# Altium PCB main.PcbDoc
Units mm, origin at the board's own origin, x right, y up, seen from the top; angles counter-clockwise.
Board outline 99 x 99 mm, 4 copper layers (Top Layer, Layer 1, Layer 2, Bottom Layer), stack 1.591 mm thick; 78 components, 40 nets, 358 pads, 49 vias.
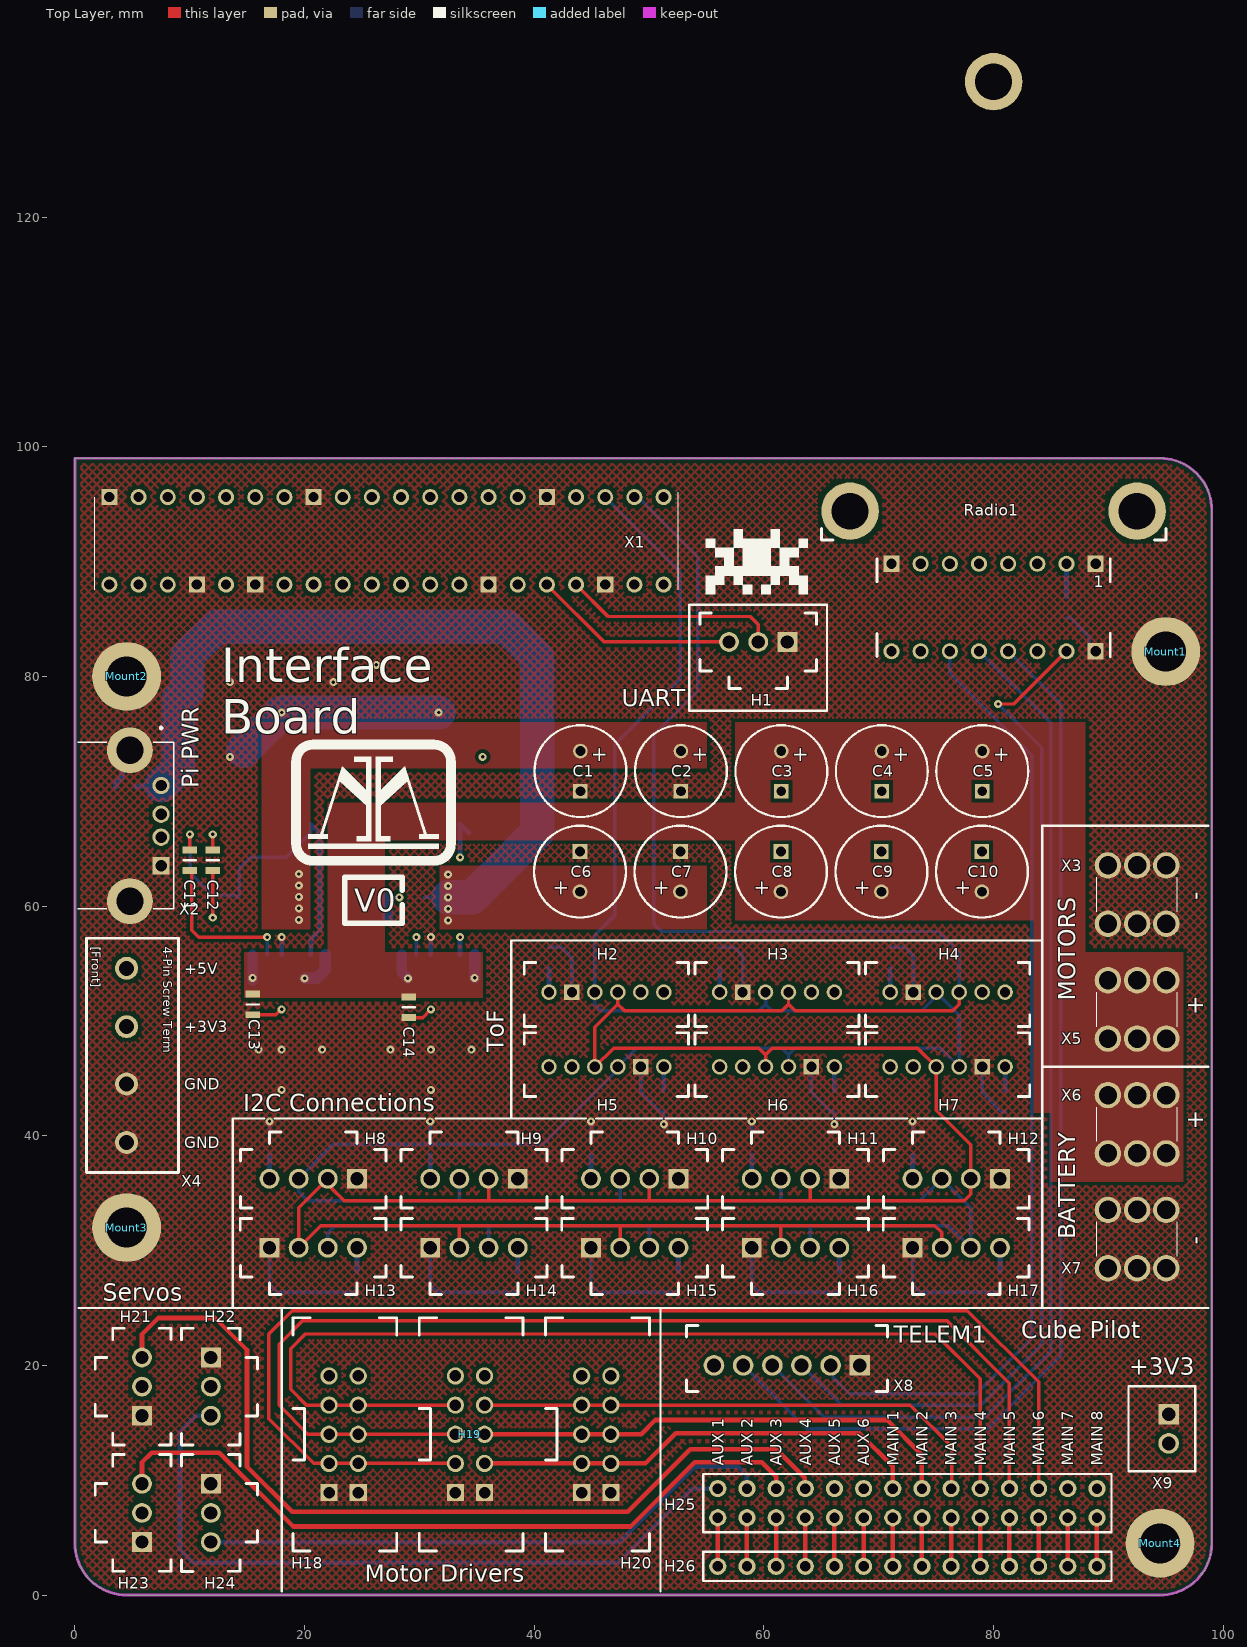
[diagram p0: Top Layer view]
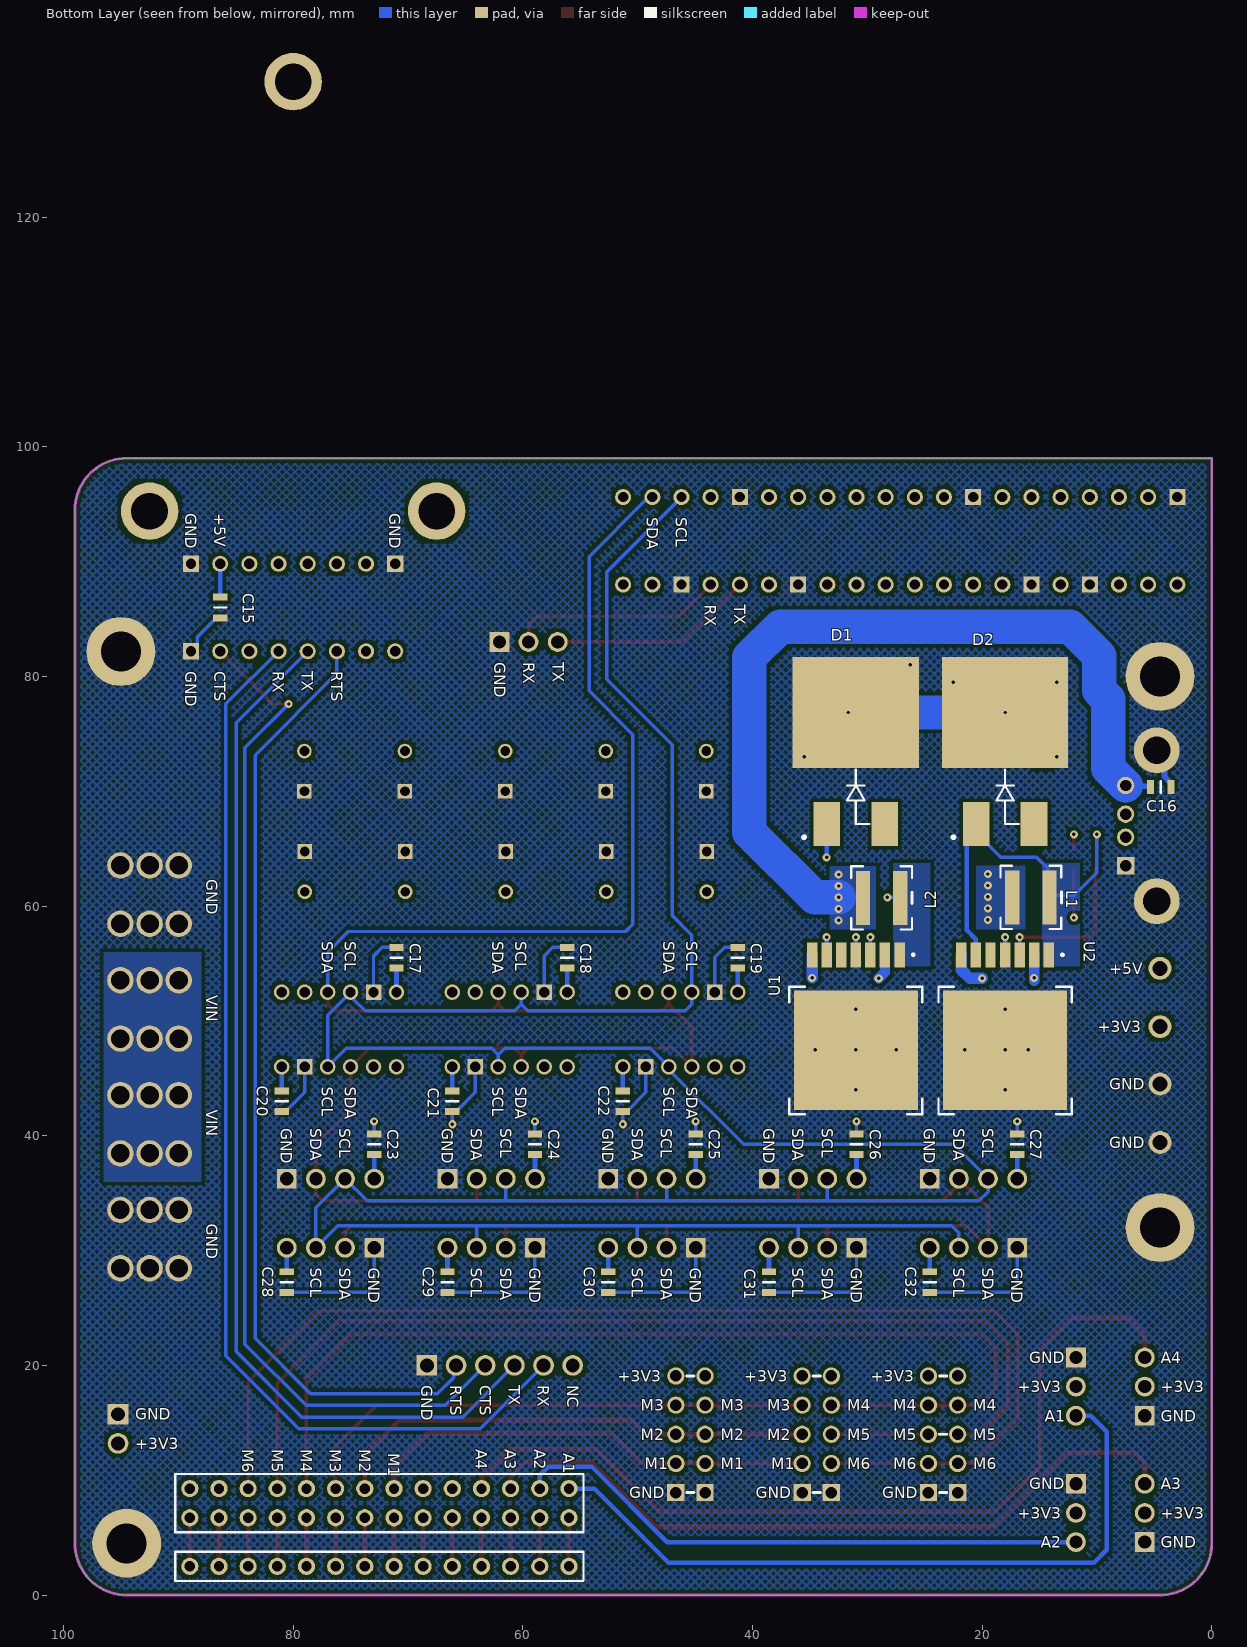
[diagram p1: Bottom Layer view, seen from below]
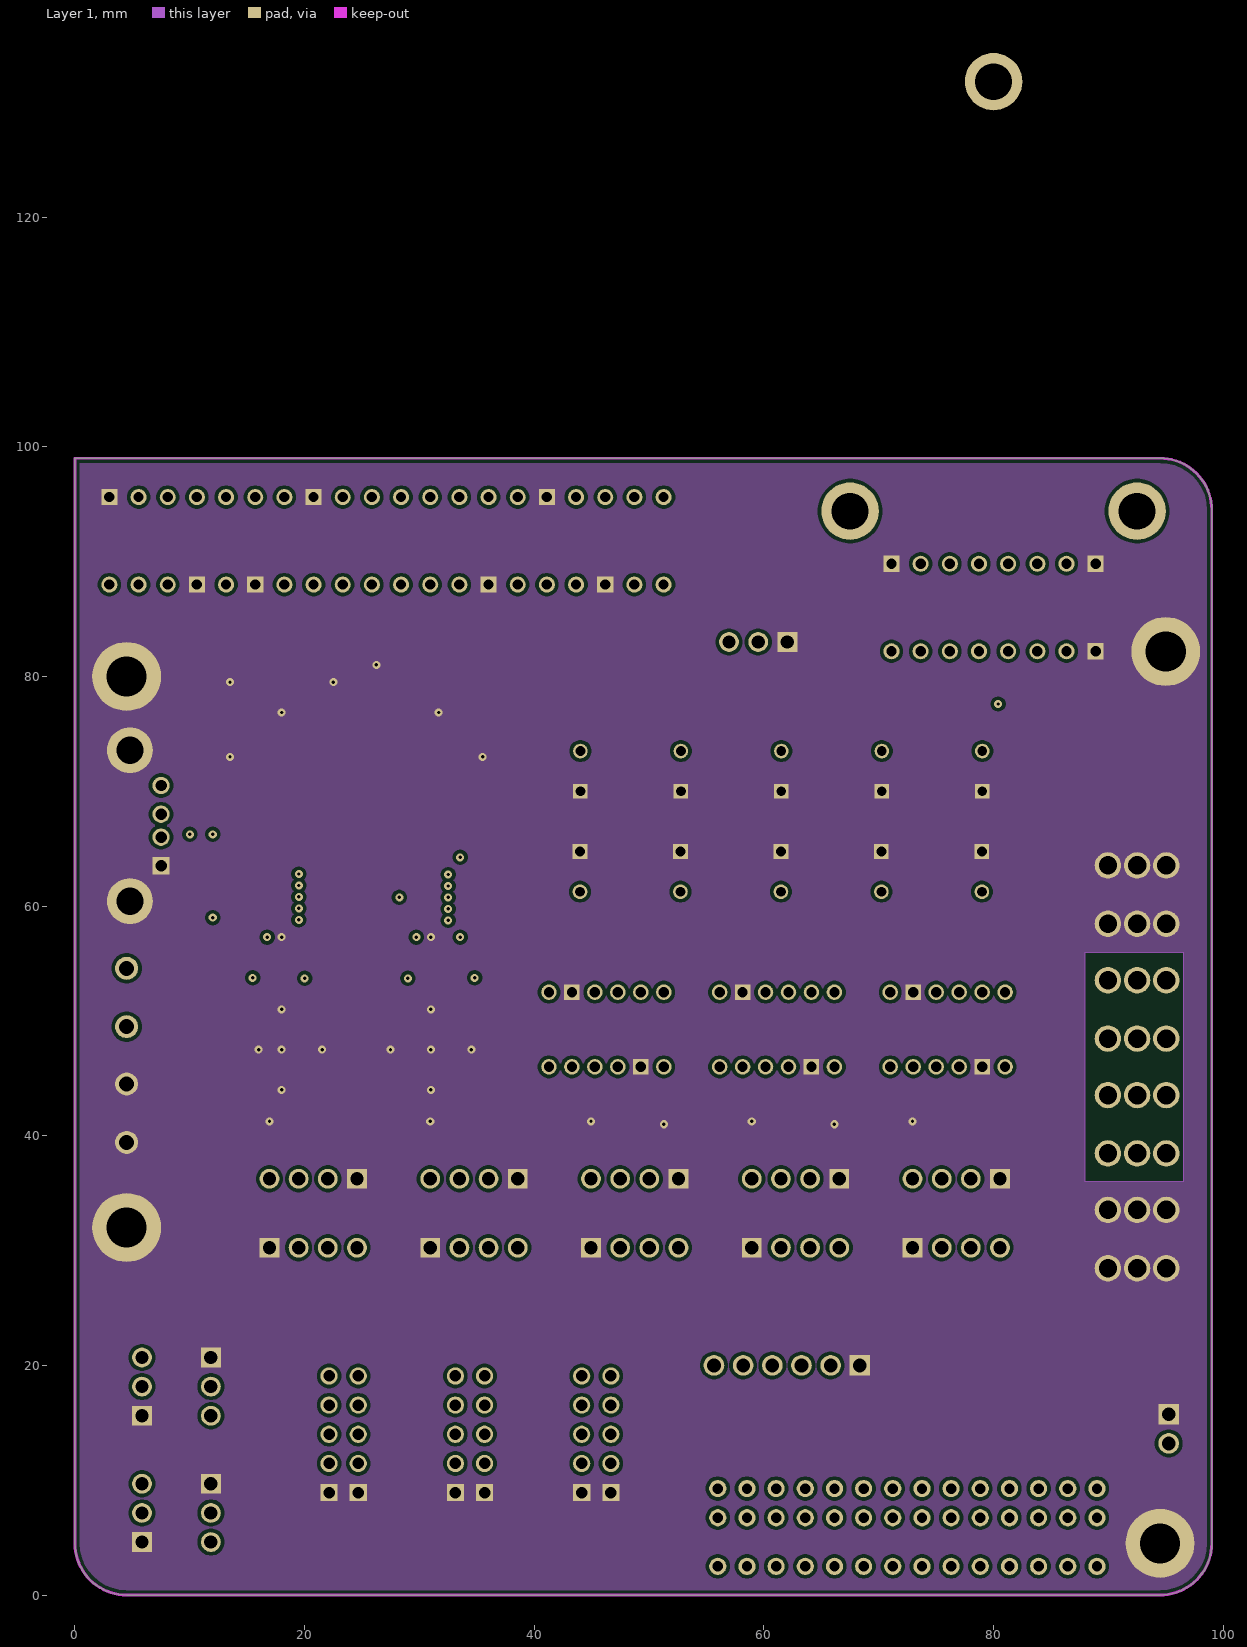
[diagram p2: Layer 1]
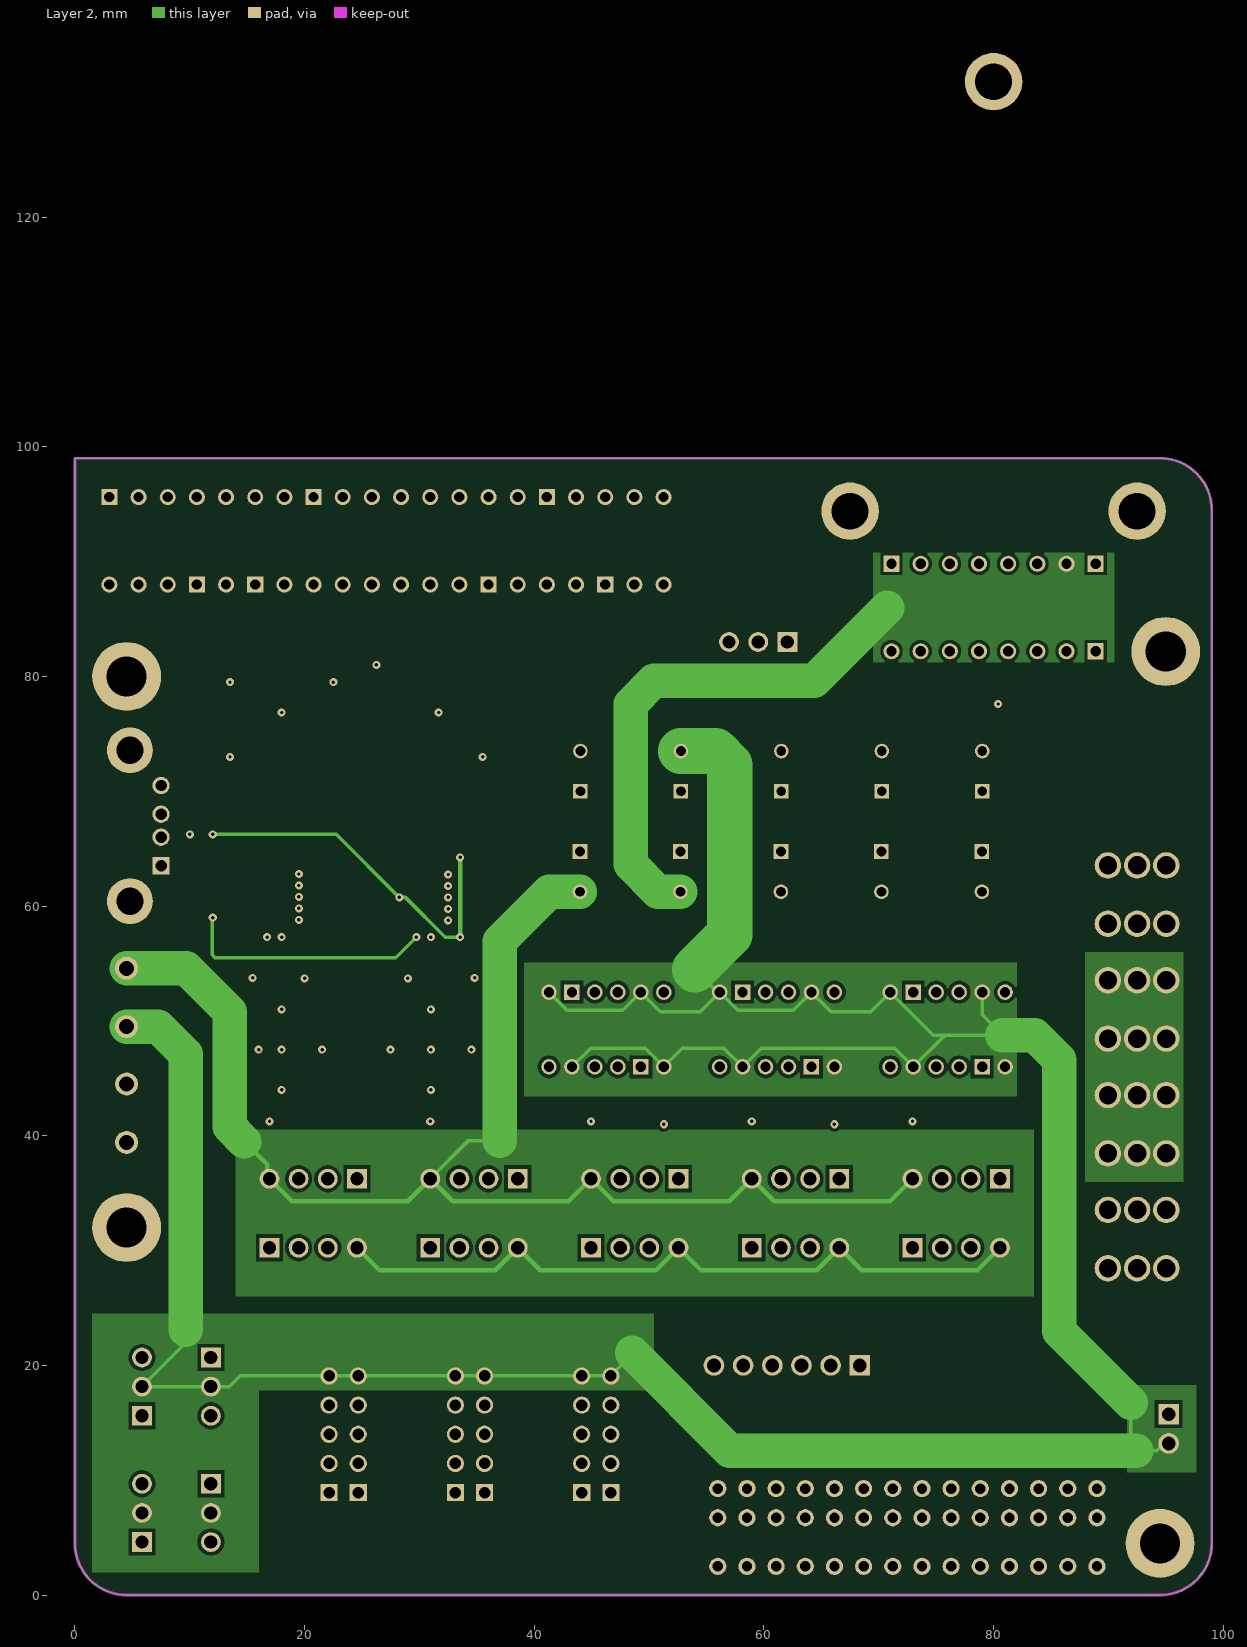
[diagram p3: Layer 2]

## Layer stack, top to bottom
Top Solder: solder mask 0.0102, Solder Resist, Dk 3.8
Top Layer: signal copper 0.035
Dielectric 2: prepreg 0.2104, 7628*1, Dk 4.4
Layer 1: signal copper 0.0175
Dielectric 1: dielectric 1.065, FR-4, Dk 4.8
Layer 2: signal copper 0.0175
Dielectric 3: prepreg 0.2104, 7628*1, Dk 4.4
Bottom Layer: signal copper 0.035
Bottom Solder: solder mask 0.0102, Solder Resist, Dk 3.8

## Board outline
4.5,0 cw(c4.5,4.5) 0,4.5 0,99 94.5,99 cw(c94.5,94.5) 99,94.5 99,4.5 cw(c94.5,4.5) 94.5,0

## Design rules (kind name [scope] priority, off if disabled: settings)
BoardOutlineClearance [All] p1: gap=0.2 ignorepadtopadclearanceinfootprint=FALSE
Clearance "inPolygon Clearance" [InPolygon] p1: gap=0.3 ignorepadtopadclearanceinfootprint=TRUE // this rule ensures that every net within a polygon of a different net has a set clearance from the poly
Clearance "Different Diff Pair" [All] p2: gap=0.2 ignorepadtopadclearanceinfootprint=TRUE
Clearance "Same Diff Pair" [All] p3: gap=0.1 ignorepadtopadclearanceinfootprint=TRUE
Clearance "Different Nets" [not InAnyDifferentialPair] p4: gap=0.3 ignorepadtopadclearanceinfootprint=TRUE except(0.1: Arc-SMDPad Arc-THPad Arc-Via Arc-Text Track-SMDPad Track-THPad Track-Via Track-Text SMDPad-Text THPad-Text Via-Text Fill-Text Poly-Text Region-Text Text-Text; 0.12: Arc-Arc Arc-Track Track-Track; 0.15: SMDPad-SMDPad SMDPad-THPad SMDPad-Via THPad-THPad THPad-Via Via-Via; 0.2: Arc-Hole Track-Hole SMDPad-Hole THPad-Hole Via-Hole Fill-Hole Poly-Hole Region-Hole Text-Hole)
Clearance "Same Net" [not InAnyDifferentialPair] p5: gap=0 ignorepadtopadclearanceinfootprint=TRUE except(0.1: THPad-Via; 0.18: Arc-Arc Arc-Track Track-Track)
ComponentClearance [All] p1: gap=0.102 collisioncheckmode=3 verticalgap=0.102 showdistances=TRUE
DiffPairsRouting "Ethernet Routing" [InDifferentialPairClass('Ethernet_Pairs')] p1: maxlimit=0.25 minlimit=0.2 mostfreqgap=0.25 toplayer_maxgap=0.2 toplayer_prefgap=0.2 toplayer_minwidth=0.25 toplayer_maxwidth=0.25 toplayer_prefwidth=0.25 midlayer1_mingap=0.25 midlayer1_minwidth=0.19 midlayer1_maxwidth=0.19 midlayer1_prefwidth=0.19 midlayer2_mingap=0.25 midlayer2_minwidth=0.19 midlayer2_maxwidth=0.19 midlayer2_prefwidth=0.19 bottomlayer_maxgap=0.2 bottomlayer_prefgap=0.2 bottomlayer_minwidth=0.25 bottomlayer_maxwidth=0.25 bottomlayer_prefwidth=0.25 impedanceprofiledriven=TRUE maxuncoupledlength=12.7
DiffPairsRouting "USB Routing" [InDifferentialPairClass('USB_Pairs')] p2: maxlimit=0.291 minlimit=0.127 mostfreqgap=0.291 toplayer_maxgap=0.127 toplayer_prefgap=0.127 toplayer_minwidth=0.23 toplayer_maxwidth=0.23 toplayer_prefwidth=0.23 midlayer1_mingap=0.291 midlayer1_minwidth=0.25 midlayer1_maxwidth=0.25 midlayer1_prefwidth=0.25 midlayer2_mingap=0.291 midlayer2_minwidth=0.25 midlayer2_maxwidth=0.25 midlayer2_prefwidth=0.25 bottomlayer_maxgap=0.127 bottomlayer_prefgap=0.127 bottomlayer_minwidth=0.23 bottomlayer_maxwidth=0.23 bottomlayer_prefwidth=0.23 impedanceprofiledriven=TRUE maxuncoupledlength=12.7
DiffPairsRouting "CAN Routing" [InDifferentialPairClass('CAN_Pairs')] p3: maxlimit=0.907 minlimit=0.5 mostfreqgap=0.907 toplayer_maxgap=0.5 toplayer_prefgap=0.5 toplayer_minwidth=0.201 toplayer_maxwidth=0.201 toplayer_prefwidth=0.201 midlayer1_mingap=0.907 midlayer1_minwidth=0.155 midlayer1_maxwidth=0.155 midlayer1_prefwidth=0.155 midlayer2_mingap=0.907 midlayer2_minwidth=0.155 midlayer2_maxwidth=0.155 midlayer2_prefwidth=0.155 bottomlayer_maxgap=0.5 bottomlayer_prefgap=0.5 bottomlayer_minwidth=0.201 bottomlayer_maxwidth=0.201 bottomlayer_prefwidth=0.201 impedanceprofiledriven=TRUE maxuncoupledlength=12.7
Height [All] p1: minheight=0 maxheight=1816.048 prefheight=12.7
HoleSize [All] p1: absolutevalues=TRUE maxlimit=6.3 minlimit=0.3 maxpercent=80.000 minpercent=20.000
HoleToHoleClearance [All] p1: gap=0.25 allowstackedmicrovias=FALSE
Length [All] p1: maxlimit=43.432 minlimit=0 usedelayunits=TRUE mindelay=0.000000 maxdelay=10000.000000
MatchedLengths "Diff Pair Matched Delays" [InDifferentialPairClass('Ethernet_Pairs') or InDifferentialPairClass('USB_Pairs') or InDifferentialPairClass('CAN_Pairs')] p1: tolerance=5 checknetsindiffpair=TRUE checkdiffpairvsdiffpair=FALSE checkxsignals=FALSE checkothers=FALSE usedelayunits=TRUE delaytolerance=100.000000
MinimumAnnularRing [All] p1: minimumring=0.2
MinimumSolderMaskSliver [All] p1: minsoldermaskwidth=0
PlaneClearance "Supply Net Clearance" [InNetClass('Supply_Nets')] p1: clearance=0.5
PlaneClearance "All Nets" [All] p2: clearance=0.3
PolygonConnect "Supply Nets" [InNetClass('Supply_Nets')] p1: connectstyle=Direct reliefconductorwidth=0.3 reliefentries=4 polygonreliefangle="90 Angle" airgapwidth=0.254
PolygonConnect General [All] p2: connectstyle=Relief reliefconductorwidth=0.254 reliefentries=4 polygonreliefangle="90 Angle" airgapwidth=0.254
RoutingVias [All] p1: holewidth=0.2 width=0.35 viastyle="Through Hole" minholewidth=0.15 minwidth=0.3 maxholewidth=6.3 maxwidth=6.55
SilkToSilkClearance [All] p1: silktosilkclearance=0
SilkToSolderMaskClearance [All] p1: minsilkscreentomaskgap=0 clearancetoexposedcopper=TRUE
SolderMaskExpansion [All] p1: expansion=0.075 istentingtop=FALSE
SupplyNets "Schematic Supply Nets_4" [InNet('+5V')] p1: voltage=0.000
SupplyNets "Schematic Supply Nets_2" [InNet('Battery VIN')] p2: voltage=0.000
SupplyNets "Schematic Supply Nets_7" [InNet('+3V3')] p3: voltage=0.000
SupplyNets "Schematic Supply Nets_3" [InNet('GND')] p4: voltage=0.000
UnRoutedNet [All] p1: checkbadconnections=TRUE
Width [All] p1: maxlimit=100 minlimit=0.1 preferedwidth=0.3
Width "nRF Width" [InNetClass('nRF Signal')] p2: maxlimit=0.379 minlimit=0.263 preferedwidth=0.379 toplayer_minwidth=0.379 midlayer1_maxwidth=0.263 midlayer1_prefwidth=0.263 midlayer2_maxwidth=0.263 midlayer2_prefwidth=0.263 bottomlayer_minwidth=0.379 impedanceprofiledriven=TRUE minimp=50.000000 maximp=50.000000 favimp=50.000000 checkconnectedcopper=TRUE
20 further rules are at their usual default settings.

## Classes and differential pairs
net class Supply_Nets: +3V3 +5V "Battery VIN" GND NetC6_2 NetC32_2
component class "Raspberry Pi and RF Devices": C15 C25 Radio1 X1
component class Misc: H1 Mount1 Mount3 Mount4
component class "Peripheral Connections": C11 C15 C21 C22 C23 C24 C25 C26 C27 C29 C31 H1 H3 H10 H13 H15 H16 H17 H20 H21 H22 H23 H25
net class "Motor VOUT": "Battery VIN"
component class Power: C3 C8 C9 C11 C13 C15 C23 C24 C25 D1 D2 L1 U1 U2 X3 X6 X9
component class "CubePilot and Motor Drivers": H1 H3 H20 H21 H22 H23 H25 H26 X8 X9

## Components (designator, comment, footprint, x,y, rotation, side; value= is the part's Value field where it differs from the comment)
C1 "Thru-Hole Polarized" "[Cap] Thru-Hole Polarized 3.5mm" 44,71.75 r270 top (schematic designator C31)
C2 "Thru-Hole Polarized" "[Cap] Thru-Hole Polarized 3.5mm" 52.75,71.75 r270 top (schematic designator C30)
C3 "Thru-Hole Polarized" "[Cap] Thru-Hole Polarized 3.5mm" 61.5,71.75 r270 top (schematic designator C9)
C4 "Thru-Hole Polarized" "[Cap] Thru-Hole Polarized 3.5mm" 70.25,71.75 r270 top (schematic designator C10)
C5 "Thru-Hole Polarized" "[Cap] Thru-Hole Polarized 3.5mm" 79,71.75 r270 top (schematic designator C8)
C6 "Thru-Hole Polarized" "[Cap] Thru-Hole Polarized 3.5mm" 44,63 r90 top (schematic designator C23)
C7 "Thru-Hole Polarized" "[Cap] Thru-Hole Polarized 3.5mm" 52.75,63 r90 top (schematic designator C22)
C8 "Thru-Hole Polarized" "[Cap] Thru-Hole Polarized 3.5mm" 61.5,63 r90 top (schematic designator C3)
C9 "Thru-Hole Polarized" "[Cap] Thru-Hole Polarized 3.5mm" 70.25,63 r90 top (schematic designator C4)
C10 "Thru-Hole Polarized" "[Cap] Thru-Hole Polarized 3.5mm" 79,63 r90 top (schematic designator C5)
C11 "SMD Nonpolarized" "[Cap] SMD 0805" 10,64 r90 top (schematic designator C32)
C12 "SMD Nonpolarized" "[Cap] SMD 0805" 12,64 r90 top (schematic designator C6)
C13 "SMD Nonpolarized" "[Cap] SMD 0805" 15.494,51.435 r90 top (schematic designator C7)
C14 "SMD Nonpolarized" "[Cap] SMD 0805" 29.083,51.181 r90 top (schematic designator C21)
C15 "SMD Nonpolarized" "[Cap] SMD 0805" 86.35,86 r270 bottom (schematic designator C2)
C16 "SMD Nonpolarized" "[Cap] SMD 0805" 4.445,70.375 r180 bottom (schematic designator C1)
C17 "SMD Nonpolarized" "[Cap] SMD 0805" 70.993,55.5 r270 bottom (schematic designator C29)
C18 "SMD Nonpolarized" "[Cap] SMD 0805" 56.14,55.5 r270 bottom (schematic designator C27)
C19 "SMD Nonpolarized" "[Cap] SMD 0805" 41.28,55.5 r270 bottom (schematic designator C25)
C20 "SMD Nonpolarized" "[Cap] SMD 0805" 81,43 r90 bottom (schematic designator C28)
C21 "SMD Nonpolarized" "[Cap] SMD 0805" 66.14,43 r90 bottom (schematic designator C26)
C22 "SMD Nonpolarized" "[Cap] SMD 0805" 51.28,43 r90 bottom (schematic designator C24)
C23 "SMD Nonpolarized" "[Cap] SMD 0805" 72.94,39.25 r270 bottom (schematic designator C12)
C24 "SMD Nonpolarized" "[Cap] SMD 0805" 58.94,39.25 r270 bottom (schematic designator C14)
C25 "SMD Nonpolarized" "[Cap] SMD 0805" 44.94,39.25 r270 bottom (schematic designator C16)
C26 "SMD Nonpolarized" "[Cap] SMD 0805" 30.94,39.25 r270 bottom (schematic designator C18)
C27 "SMD Nonpolarized" "[Cap] SMD 0805" 16.94,39.25 r270 bottom (schematic designator C20)
C28 "SMD Nonpolarized" "[Cap] SMD 0805" 80.56,27.25 r90 bottom (schematic designator C11)
C29 "SMD Nonpolarized" "[Cap] SMD 0805" 66.56,27.25 r90 bottom (schematic designator C13)
C30 "SMD Nonpolarized" "[Cap] SMD 0805" 52.56,27.25 r90 bottom (schematic designator C15)
C31 "SMD Nonpolarized" "[Cap] SMD 0805" 38.56,27.25 r90 bottom (schematic designator C17)
C32 "SMD Nonpolarized" "[Cap] SMD 0805" 24.56,27.25 r90 bottom (schematic designator C19)
D1 "Schottky" "[Diode] SMD TO263AB" 31,72 r180 bottom
D2 "Schottky" "[Diode] SMD TO263AB" 18,72 r180 bottom
H1 "1x3 Male" "[Header] Shrouded 1x3 Male" 59.5,83 r180 top (schematic designator H18)
H2 "35362-0650" "[Sherlock] 6pin" 46.28,52.5 r0 top (schematic designator H22)
H3 "35362-0650" "[Sherlock] 6pin" 61.14,52.5 r0 top (schematic designator H24)
H4 "35362-0650" "[Sherlock] 6pin" 76,52.5 r0 top (schematic designator H26)
H5 "35362-0650" "[Sherlock] 6pin" 46.28,46 r180 top (schematic designator H21)
H6 "35362-0650" "[Sherlock] 6pin" 61.14,46 r180 top (schematic designator H23)
H7 "35362-0650" "[Sherlock] 6pin" 76,46 r180 top (schematic designator H25)
H8 "1x4 Male" "[Header] Shrouded 1x4 Male" 20.75,36.25 r0 top (schematic designator H20)
H9 "1x4 Male" "[Header] Shrouded 1x4 Male" 34.75,36.25 r0 top (schematic designator H16)
H10 "1x4 Male" "[Header] Shrouded 1x4 Male" 48.75,36.25 r0 top (schematic designator H14)
H11 "1x4 Male" "[Header] Shrouded 1x4 Male" 62.75,36.25 r0 top (schematic designator H12)
H12 "1x4 Male" "[Header] Shrouded 1x4 Male" 76.75,36.25 r0 top (schematic designator H10)
H13 "1x4 Male" "[Header] Shrouded 1x4 Male" 20.75,30.25 r180 top (schematic designator H17)
H14 "1x4 Male" "[Header] Shrouded 1x4 Male" 34.75,30.25 r180 top (schematic designator H15)
H15 "1x4 Male" "[Header] Shrouded 1x4 Male" 48.75,30.25 r180 top (schematic designator H13)
H16 "1x4 Male" "[Header] Shrouded 1x4 Male" 62.75,30.25 r180 top (schematic designator H11)
H17 "1x4 Male" "[Header] Shrouded 1x4 Male" 76.75,30.25 r180 top (schematic designator H9)
H18 "2x5 Shrouded" "[Header] Shrouded 2x5 Male" 23.5,14 r270 top (schematic designator H6)
H19 "2x5 Shrouded" "[Header] Shrouded 2x5 Male" 34.5,14 r270 top (schematic designator H7)
H20 "2x5 Shrouded" "[Header] Shrouded 2x5 Male" 45.5,14 r270 top (schematic designator H8)
H21 "1x3 Male" "[Header] Shrouded 1x3 Male" 5.834,18.151 r90 top (schematic designator H5)
H22 "1x3 Male" "[Header] Shrouded 1x3 Male" 11.834,18.151 r270 top (schematic designator H2)
H23 "1x3 Male" "[Header] Shrouded 1x3 Male" 5.834,7.151 r90 top (schematic designator H4)
H24 "1x3 Male" "[Header] Shrouded 1x3 Male" 11.834,7.151 r270 top (schematic designator H3)
H25 "2x14 Header" "[Header] 2x14 Male" 72.49,8 r180 top (schematic designator H19)
H26 "1x14 Female Right Angle" "[Header] 1x14 Right Angle Female" 89,2.5 r180 top (schematic designator H1)
L1 "SMD Inductor" "[Inductor] 5.7 x 5.5 x 5 mm" 15.75,60.75 r90 bottom (schematic designator L2)
L2 "SMD Inductor" "[Inductor] 5.7 x 5.5 x 5 mm" 28.75,60.706 r90 bottom (schematic designator L1)
Mount1 "M3 Mount Hole" "[Mount] M3 Mount Hole"#1 91.841,83.305 r90 top (schematic designator Mount2)
Mount2 "M3 Mount Hole" "[Mount] M3 Mount Hole"#2 11.425,58.112 r0 top (schematic designator Mount1)
Mount3 "M3 Mount Hole" "[Mount] M3 Mount Hole"#3 6.223,31.496 r90 top
Mount4 "M3 Mount Hole" "[Mount] M3 Mount Hole"#4 94.5,4.5 r90 top
Radio1 "RFDX900" "[Device] RFDX900 Radio" 80,86 r0 top
U1 "5V 5A" "[Reg] 5V Regulator (3)" 31,49.5 r90 bottom
U2 "LM2678SX-3.3" "[Reg] 3V3 Regulator (3)" 18,49.5 r90 bottom
X1 "Raspberry Pi 5" "[Device] Raspberry Pi 5" 3,88 r0 top
X2 "Type A" "[Port] USB Type-A Female" 7.5,67 r270 top (schematic designator X8)
X3 "7461057" "[Port] Shank Connector (100A)" 92.5,61 r90 top (schematic designator X4)
X4 "4pin Screw Terminal" "[Screw Terminal] 4pin 5mm" 4.5,47 r270 top (schematic designator X9)
X5 "7461057" "[Port] Shank Connector (100A)" 92.5,51 r90 top (schematic designator X3)
X6 "7461057" "[Port] Shank Connector (100A)" 92.5,41 r90 top (schematic designator X2)
X7 "7461057" "[Port] Shank Connector (100A)" 92.5,31 r90 top (schematic designator X5)
X8 "JST" "[JST] 6pin 2.54mm" 62,20 r0 top (schematic designator X6)
X9 "JST" "[JST] 2PIN 2.54mm" 95.25,14.478 r90 top (schematic designator X7)

## Footprints (in the part's own frame and the unit in brackets; to place one, negate y for a bottom-side part, rotate by r counter-clockwise, add the part's x,y. Pads: shape width x height; smd on the part's side, far side on the other; paste and mask are expansions set on the pad)
"[Cap] SMD 0805" [mm]
  rect 0.6x1.25 smd: 1(-0.9,0) 2(0.9,0)
  silkscreen extent 0,-0.53 0,0.53, body extent -1,-0.63 1,0.63, height 1
"[Cap] Thru-Hole Polarized 3.5mm" [mm] "3.5mm"
  round 1.275 hole 0.85: 1(-1.75,0.018)
  rect 1.275x1.275 hole 0.85: 2(1.75,0.018)
  silkscreen extent -4,-3.98 4,4.02, body extent -4.24,-4.25 4.24,4.25, height 13
"[Device] Raspberry Pi 5" [mm]
  round 1.4 hole 0.9: 1(48.26,7.62) 2(48.26,0) 3(45.72,7.62) 4(45.72,0) 5(43.18,7.62) 7(40.64,7.62) 8(40.64,0) 10(38.1,0) 11(35.56,7.62) 12(35.56,0) 13(33.02,7.62) 15(30.48,7.62) 16(30.48,0) 17(27.94,7.62) 18(27.94,0) 19(25.4,7.62) 20(25.4,0) 21(22.86,7.62) 22(22.86,0) 23(20.32,7.62) 24(20.32,0) 26(17.78,0) 27(15.24,7.62) 28(15.24,0) 29(12.7,7.62) 31(10.16,7.62) 32(10.16,0) 33(7.62,7.62) 35(5.08,7.62) 36(5.08,0) 37(2.54,7.62) 38(2.54,0) 40(0,0)
  rect 1.4x1.4 hole 0.9: GND(0,7.62) GND(7.62,0) GND(12.7,0) GND(17.78,7.62) GND(33.02,0) GND(38.1,7.62) GND(43.18,0)
  silkscreen extent -1.27,-0.44 49.53,8.06, body extent -32.39,-7.99 56.65,12.65, height 56.94
"[Device] RFDX900 Radio" [mm] "RFDX900 Long-Range RF Module"
  rect 1.4x1.4 hole 0.9: 1(8.89,-3.81) 2(8.89,3.81) 16(-8.89,3.81)
  round 1.4 hole 0.9: 3(6.35,-3.81) 4(6.35,3.81) 5(3.81,-3.81) 6(3.81,3.81) 7(1.27,-3.81) 8(1.27,3.81) 9(-1.27,-3.81) 10(-1.27,3.81) 11(-3.81,-3.81) 12(-3.81,3.81) 13(-6.35,-3.81) 14(-6.35,3.81) 15(-8.89,-3.81)
  round 5 hole 3.2: X(-12.5,8.395) X(0,45.795) X(12.5,8.395)
  silkscreen extent -15,-4.25 15,6.9, body extent -15,-4.25 15,100.2, height 12.75
"[Diode] SMD TO263AB" [mm]
  rect 2.32x3.81 smd: 1(-2.525,-4.86) 3(2.525,-4.86)
  rect 11x9.65 smd: 2(0,4.86)
  silkscreen extent -4.6,-6.1 1.19,-0.14, body extent -5.33,-7.05 5.33,10.48, height 4.83
"[Header] 1x14 Right Angle Female" [mm]
  round 1.5 hole 0.9: 1(0,0) 2(2.54,0) 3(5.08,0) 4(7.62,0) 5(10.16,0) 6(12.7,0) 7(15.24,0) 8(17.78,0) 9(20.32,0) 10(22.86,0) 11(25.4,0) 12(27.94,0) 13(30.48,0) 14(33.02,0)
  silkscreen extent -1.27,-1.27 34.29,1.27, body extent -1.29,-0.2 34.27,10.15, height 3
"[Header] 2x14 Male" [mm] "2.54mm pitch"
  round 1.5 hole 0.9: 1(-16.51,-1.27) 2(-16.51,1.27) 3(-13.97,-1.27) 4(-13.97,1.27) 5(-11.43,-1.27) 6(-11.43,1.27) 7(-8.89,-1.27) 8(-8.89,1.27) 9(-6.35,-1.27) 10(-6.35,1.27) 11(-3.81,-1.27) 12(-3.81,1.27) 13(-1.27,-1.27) 14(-1.27,1.27) 15(1.27,-1.27) 16(1.27,1.27) 17(3.81,-1.27) 18(3.81,1.27) 19(6.35,-1.27) 20(6.35,1.27) 21(8.89,-1.27) 22(8.89,1.27) 23(11.43,-1.27) 24(11.43,1.27) 25(13.97,-1.27) 26(13.97,1.27) 27(16.51,-1.27) 28(16.51,1.27)
  silkscreen extent -17.78,-2.54 17.78,2.54, body extent -17.78,-2.54 17.78,2.54, height 9.5
"[Header] Shrouded 1x3 Male" [mm] "070543-0037 / Mates with 005057-9403"
  rect 1.725x1.725 hole 1.15: 1(-2.54,0)
  round 1.725 hole 1.15: 2(0,0) 3(2.54,0)
  silkscreen extent -5.08,-2.54 5.09,4.06, body extent -5.08,-2.54 5.08,4.06, height 11.67
"[Header] Shrouded 1x4 Male" [mm] "70543-0003 / Mates with 0050579404"
  round 1.725 hole 1.15: 1(-3.81,0) 2(-1.27,0) 3(1.27,0)
  rect 1.725x1.725 hole 1.15: 4(3.81,0)
  silkscreen extent -6.35,-2.54 6.36,4.06, body extent -6.35,-2.54 6.35,4.06, height 11.64
"[Header] Shrouded 2x5 Male" [mm]
  round 1.5 hole 1: 1(-5.08,-1.37) 2(-5.08,1.17) 3(-2.54,-1.37) 4(-2.54,1.17) 5(0,-1.37) 6(0,1.17) 7(2.54,-1.37) 8(2.54,1.17)
  rect 1.5x1.5 hole 1: 9(5.08,-1.37) 10(5.08,1.17)
  silkscreen extent -10.15,-4.52 10.15,4.52, body extent -10.15,-4.52 10.15,4.52, height 8.8
"[Inductor] 5.7 x 5.5 x 5 mm" [mm]
  rect 4.7x1.25 smd: 1(0,-1.625) 2(0,1.625)
  silkscreen extent -2.75,-2.65 2.75,2.65, body extent -2.75,-2.65 2.75,2.65, height 5.1
"[JST] 2PIN 2.54mm" [mm]
  round 1.8 hole 1.2: 1(-1.27,0)
  rect 1.8x1.8 hole 1.2: 2(1.27,0)
  silkscreen extent -3.7,-2.3 3.7,3.5, body extent -3.67,-2.28 3.67,3.47, height 7.88
"[JST] 6pin 2.54mm" [mm] "2.54mm pitch"
  round 1.8 hole 1.2: 1(-6.35,0) 2(-3.81,0) 3(-1.27,0) 4(1.27,0) 5(3.81,0)
  rect 1.8x1.8 hole 1.2: 6(6.35,0)
  silkscreen extent -8.75,-2.28 8.75,3.47, body extent -8.75,-2.28 8.75,3.47, height 6.88
"[Mount] M3 Mount Hole"#1 [mm] "Place at least 4.5mm from board edge. Plated."
  round 6 hole 3.5: 1(-1.136,-3.155)
"[Mount] M3 Mount Hole"#2 [mm] "Place at least 4.5mm from board edge. Plated."
  round 6 hole 3.5: 1(-6.925,21.888)
"[Mount] M3 Mount Hole"#3 [mm] "Place at least 4.5mm from board edge. Plated."
  round 6 hole 3.5: 1(0.504,1.723)
"[Mount] M3 Mount Hole"#4 [mm] "Place at least 4.5mm from board edge. Plated."
  round 6 hole 3.5: 1(0,0)
"[Port] Shank Connector (100A)" [mm]
  round 2.3 hole 1.6: 1(-2.54,-2.54) 1(-2.54,0) 1(-2.54,2.54) 1(2.54,-2.54) 1(2.54,0) 1(2.54,2.54)
  silkscreen extent -1.5,-3.5 1.5,3.5, body extent -3.5,-3.5 3.5,3.5, height 6
"[Port] USB Type-A Female" [mm]
  round 1.508 hole 1: 1(-3.5,0) 2(-1,0) 3(1,0)
  rect 1.508x1.508 hole 1: 4(3.5,0)
  round 4 hole 2.38: S1(-6.57,-2.71) S2(6.57,-2.71)
  silkscreen extent -8.61,-7.24 7.25,1.09, body extent -7.9,-13.01 7.9,1.09, height 7.6
"[Reg] 3V3 Regulator (3)" [mm] "LM2678SX-3.3/NOPB"
  rect 2.16x0.91 smd: 1(6.25,-3.81) 2(6.25,-2.54) 3(6.25,-1.27) 4(6.25,0) 5(6.25,1.27) 6(6.25,2.54) 7(6.25,3.81)
  rect 10.41x10.8 smd: 8(-2.07,0)
  silkscreen extent -7.62,-5.8 6.35,5.8, body extent -7.12,-5.08 7.18,5.08, height 4.72
"[Reg] 5V Regulator (3)" [mm] "LM2678SX-5.0/NOPB"
  rect 2.16x0.91 smd: 1(6.25,-3.81) 2(6.25,-2.54) 3(6.25,-1.27) 4(6.25,0) 5(6.25,1.27) 6(6.25,2.54) 7(6.25,3.81)
  rect 10.41x10.8 smd: 8(-2.07,0)
  silkscreen extent -7.62,-5.8 6.35,5.8, body extent -7.12,-5.08 7.18,5.08, height 4.72
"[Screw Terminal] 4pin 5mm" [mm]
  round 2 hole 1.3: 1(-7.58,0) 2(-2.5,0) 3(2.5,0) 4(7.58,0)
  silkscreen extent -10.2,-3.5 10.2,4.5, body extent -10.53,-3.5 10.09,4.1, height 9.99
"[Sherlock] 6pin" [mm] "2.00mm pitch"
  round 1.35 hole 0.9: 1(-5,0) 3(-1,0) 4(1,0) 5(3,0) 6(5,0)
  rect 1.35x1.35 hole 0.9: 2(-3,0)
  silkscreen extent -7.15,-2.97 7.15,2.58, body extent -7.15,-2.97 7.15,2.58, height 8.5

## Part data
C1 C2 C6 C7: library part "[Cap] Thru-Hole Polarized", "EEU-FC1H150H", Capacitance=180uF, Tolerance=20%, Voltage=50V, Pin Spacing=3mm
C3 C4 C5 C8 C9 C10: library part "[Cap] Thru-Hole Polarized", "EEU-FC1H150H", Capacitance=15uF, Tolerance=20%, Voltage=50V, Pin Spacing=3mm
C11 C12: library part "[Cap] SMD Nonpolarized", Capacitance=100nF, Size Package=0805, Tolerance=20%, Voltage=6.3V
C13 C14: library part "[Cap] SMD Nonpolarized", Capacitance=0.47uF, Size Package=0805, Tolerance=20%, Voltage=50V
C15 C16 C17 C18 C19 C20 C21 C22 C23 C24 C25 C26 C27 C28 C29 C30 C31 C32: library part "[Cap] SMD Nonpolarized", Capacitance=100nF, Size Package=0805
D1 D2: library part "[Diode] SMD Schottky", "Generic", Size Package=TO263AB
H1 H21 H22 H23 H24: library part "[Header] Shrouded 1x3 Male", "070543-0037 / Mates with 005057-9403", Supplier Part Number 1=WM4825-ND, Supplier 1=DigiKey
H2 H3 H4 H5 H6 H7: library part "[Sherlock] 6pin", "2.00mm pitch"
H8 H9 H10 H11 H12 H13 H14 H15 H16 H17: library part "[Header] Shrouded 1x4 Male", "70543-0003 / Mates with 0050579404"
H18 H19 H20: library part "[Header] Shrouded 2x5 Male", "BHR-10-VUA"
H25: library part "[Header] 2x14 Male", "2.54mm pitch"
H26: library part "[Header] 1x14 Right Angle Female", "2.54mm pitch"
L1 L2: library part "[Inductor] SMD Inductor", Inductance=10uH, Size Package=5.7x5.5x5.0mm
Mount1 Mount2 Mount3 Mount4: library part "[Mount] M3 Mount Hole", "Place at least 4.5mm from board edge. Plated."
Radio1: library part "[Device] RFDX900 Radio", "RFDX900 Long-Range RF Module"
U1: library part "[Reg] 5V Regulator (3)", "LM2678SX-5.0/NOPB", Supplier Part Number 1=LM2678SX-5.0/NOPBCT-ND, Supplier 1=DigiKey
U2: library part "[Reg] 3V3 Regulator (3)", "LM2678SX-3.3/NOPB", Supplier Part Number 1=LM2678SX-3.3/NOPBCT-ND, Supplier 1=DigiKey
X1: library part "[Device] Raspberry Pi 5"
X2: library part "[Port] USB Type-A Female (Thru-Hole)"
X3 X5 X6 X7: library part "[Port] Shank Connector (100A)", "7461057, internal thread"
X4: library part "[Screw Terminal] 4pin"
X8: library part "[JST] 6pin 2.54mm", "2.54mm pitch"
X9: library part "[JST] 2pin 2.54mm", "2.54mm pitch"

## Via types
v1: diameter 0.7, hole 0.3, Top Layer to Bottom Layer, 49 vias

## Nets (pads, with @x,y where several pads share a name; then routed paths per layer and width w, separated by ;. In a path a pad name is that pad's centre, name@x,y a point inside that pad or via, vN(x,y) a via of type N, cw(c..) or ccw(c..) an arc to the next point about the centre after c; other vN are vias at no path point)
+3V3: C1.1 C2.1 C17.2 C18.2 C19.2 C20.2 C21.2 C22.2 H2.1 H2.5 H3.1 H3.5 H4.1 H4.5 H5.1 H5.5 H6.1 H6.5 H7.1 H7.5 H18.1 H18.2 H19.1 H19.2 H20.1 H20.2 H21.2 H22.2 H23.2 H24.2 L1.2 X4.2 X9.1 | length 301.9
  Layer 2 w0.3: 9.652,23.114 9.652,21.969 H21.2 H22.2 13.452,18.151 14.381,19.08 H18.1 H18.2 H19.1 H19.2 H20.1 H20.2 48.514,20.924 48.514,21.082 ; H2.1 42.853,50.927 47.707,50.927 H2.5 50.98,50.8 54.44,50.8 H3.1 ; H5.5 44.905,47.625 49.655,47.625 H5.1 52.905,47.625 56.515,47.625 H6.5 59.765,47.625 71.375,47.625 H7.5 75.768,48.768 ; 53.975,54.483 55.958,52.5 H3.1 ; H4.5 79,50.54 80.772,48.768 75.768,48.768 ; 91.948,16.764 91.948,13.033 92.408,12.573 94.209,12.573 94.844,13.208 X9.1 ; H3.1 57.713,50.927 62.567,50.927 H3.5 65.84,50.8 69.3,50.8 H4.1 74.732,48.768 75.768,48.768
  Layer 2 w3: X4.2 7.269,49.5 9.652,47.117 9.652,23.114 ; 48.514,21.082 57.023,12.573 92.408,12.573 ; 80.772,48.768 83.566,48.768 85.725,46.609 85.725,22.987 91.948,16.764
  Layer 2 w4: C2.1 55.799,73.5 57.023,72.276 57.023,57.531 53.975,54.483
  Bottom Layer w0.4: H2.1 C19.2 ; C22.2 H5.1 ; H3.1 C18.2 ; C21.2 H6.1 ; C17.2 71,54.593 H4.1 ; C20.2 H7.1
  other v1: 19.5,58.794 19.5,59.794 19.5,60.794 19.5,61.794 19.5,62.794
+5V: C6.1 C7.1 C15.1 C16.1 C23.2 C24.2 C25.2 C26.2 C27.2 C28.2 C29.2 C30.2 C31.2 C32.2 H8.1 H9.1 H10.1 H11.1 H12.1 H13.1 H14.1 H15.1 H16.1 H17.1 L2.2 Radio1.4 X2.1 X4.1 | length 328.8
  Layer 2 w0.3: H9.1 34.271,39.581 37,39.581 ; 41.148,61.25 41.311,61.25
  Layer 2 w0.4: 14.732,39.497 16.736,37.493 16.736,36.454 H8.1 18.9,34.29 28.98,34.29 H9.1 32.9,34.29 42.98,34.29 H10.1 46.9,34.29 56.98,34.29 H11.1 60.9,34.29 70.98,34.29 H12.1 ; H13.1 26.52,28.29 36.6,28.29 H14.1 40.52,28.29 50.6,28.29 H15.1 54.52,28.29 64.6,28.29 H16.1 68.52,28.29 78.6,28.29 H17.1
  Layer 2 w3: X4.1 9.682,54.58 13.462,50.8 13.462,40.767 14.732,39.497 ; 37,39.581 37,56.939 41.311,61.25 C6.1 ; C7.1 50.764,61.25 48.387,63.627 48.387,77.597 50.419,79.629 64.389,79.629 70.739,85.979
  Bottom Layer w0.3: L2.2 30.419,60.75 v1(32.5,60.75)
  Bottom Layer w0.4: H8.1 C27.2 ; C32.2 H13.1 ; H9.1 C26.2 ; C31.2 H14.1 ; H10.1 C25.2 ; C30.2 H15.1 ; H11.1 C24.2 ; C29.2 H16.1 ; H12.1 C23.2 ; C28.2 H17.1 ; C15.1 Radio1.4
  Bottom Layer w0.5: C16.1 5.345,70.387 5.395,70.437 7.437,70.437 X2.1
  Bottom Layer w3: X2.1 9.017,72.017 9.017,78.012 9.779,78.774 9.779,81.779 12.328,84.328 37.592,84.328 40.259,81.661 40.259,66.421 34.588,60.75 v1(32.5,60.75)
  other v1: 32.5,58.75 32.5,59.75 32.5,61.75 32.5,62.75
"AUX Out 1": H25.28 H26.14 | length 4.2
  Top Layer w0.4: H26.14 H25.28
"AUX Out 1_X": H22.3 H25.27 | length 63.5
  Bottom Layer w0.4: H22.3 10.531,15.611 9.144,14.224 9.144,3.937 10.287,2.794 47.287,2.794 53.593,9.101 53.763,9.27 H25.27
"AUX Out 2": H25.26 H26.13 | length 4.2
  Top Layer w0.4: H26.13 H25.26
"AUX Out 2_X": H24.3 H25.25 | length 50.9
  Bottom Layer w0.4: H24.3 47.41,4.611 53.975,11.176 57.785,11.176 58.52,10.441 H25.25
"AUX Out 3": H25.24 H26.12 | length 4.2
  Top Layer w0.4: H26.12 H25.24
"AUX Out 3_X": H23.3 H25.23 | length 64
  Top Layer w0.4: H23.3 5.834,11.549 6.682,12.397 12.573,12.397 19.001,5.969 48.387,5.969 53.975,11.557 59.817,11.557 61.06,10.314 H25.23
"AUX Out 4": H25.22 H26.11 | length 4.2
  Top Layer w0.4: H26.11 H25.22
"AUX Out 4_X": H21.3 H25.21 | length 77.5
  Top Layer w0.4: H21.3 5.834,22.725 7.239,24.13 12.192,24.13 14.986,21.336 14.986,11.176 18.923,7.239 48.133,7.239 53.594,12.7 61.087,12.7 63.557,10.23 63.557,9.314 H25.21
"AUX Out 5": H25.20 H26.10 | length 4.2
  Top Layer w0.4: H26.10 H25.20
"AUX Out 6": H25.18 H26.9 | length 4.2
  Top Layer w0.4: H26.9 H25.18
"Battery RX": H1.2 X1.8 | length 18.8
  Top Layer w0.3: X1.8 46.423,85.217 58.801,85.217 59.5,84.518 H1.2
"Battery TX": H1.3 X1.10 | length 17.9
  Top Layer w0.3: X1.10 46.1,83 H1.3
"Battery VIN": C3.1 C4.1 C5.1 C8.1 C9.1 C10.1 C13.2 C14.2 U1.2 U1.7 U2.2 U2.7 X5.1 X6.1 | length 9.9
  Bottom Layer w0.9: v1@15.46,53.501 U2.2 ; U1.2 28.46,54.24 v1(29,53.7)
  Bottom Layer w1: v1(20,53.7) 21.061,53.7 21.81,54.449 U2.7 ; v1@34.81,53.75 U1.7
  other v1: 15.47,53.75 34.8,53.75
GND: C1.2 C2.2 C3.2 C4.2 C5.2 C6.2 C7.2 C8.2 C9.2 C10.2 C13.1 C14.1 C15.2 C16.2 C17.1 C18.1 C19.1 C20.1 C21.1 C22.1 C23.1 C24.1 C25.1 C26.1 C27.1 C28.1 C29.1 C30.1 C31.1 C32.1 D1.2 D2.2 H1.1 H2.2 H3.2 H4.2 H5.2 H6.2 H7.2 H8.4 H9.4 H10.4 H11.4 H12.4 H13.4 H14.4 H15.4 H16.4 H17.4 H18.9 H18.10 H19.9 H19.10 H20.9 H20.10 H21.1 H22.1 H23.1 H24.1 Mount1.1 Mount2.1 Mount3.1 Mount4.1 Radio1.1 Radio1.2 Radio1.16 U1.4 U1.8 U2.4 U2.8 X1.GND X2.4 X2.S1 X2.S2 X3.1 X4.3 X4.4 X7.1 X8.6 X9.2 | length 128.7
  Top Layer w0.3: C13.1 17.503,50.535 17.968,51 v1(18,51) ; C14.1 30.281,50.281 v1(31,51)
  Bottom Layer w0.3: H13.4 16.94,27.009 17.599,26.35 C32.1 ; C27.1 v1(16.94,41.25) ; H14.4 30.94,27.009 31.599,26.35 C31.1 ; C26.1 v1(30.94,41.25) ; C19.1 42.406,56.4 43.28,55.526 H2.2 ; H15.4 44.94,27.009 45.599,26.35 C30.1 ; C25.1 v1(44.94,41.25) ; H5.2 49.28,43.775 50.955,42.1 C22.1 v1(51.28,41) ; C18.1 57.392,56.4 58.14,55.652 H3.2 ; H16.4 58.94,27.009 59.599,26.35 C29.1 ; C24.1 v1(58.94,41.25) ; H6.2 64.14,43.775 65.815,42.1 C21.1 v1(66.14,41) ; C17.1 72.251,56.4 73,55.651 H4.2 ; H17.4 72.94,27.009 73.599,26.35 C28.1 ; C23.1 v1(72.94,41.25) ; H7.2 79,43.775 80.675,42.1 C20.1 ; C15.2 86.675,85.1 88.34,83.435 88.34,82.74 Radio1.1
  Bottom Layer w0.4: U2.4 v1(18,57.3) ; U1.4 v1(31,57.3)
  Bottom Layer w0.5: C16.2 3.545,70.7 4.12,71.275 4.12,72.9 X2.S1
  Bottom Layer w3: D2.2@14.675,73.535 v1(18,76.86) D1.2 v1(31.675,76.86)
  other v1: 18,44 31,44 16,47.5 18,47.5 21.52,47.5 27.48,47.5 31,47.5 34.52,47.5 13.5,73 35.5,73 13.5,79.5 22.5,79.5 26.25,81
"Main Out 1": H25.16 H26.8 | length 4.2
  Top Layer w0.4: H26.8 H25.16
"Main Out 1_X": H19.8 H20.7 H20.8 H25.15 | length 39.8
  Top Layer w0.4: H19.8 H20.7 H20.8 49.687,11.46 52.324,14.097 68.326,14.097 71.22,11.203 H25.15
"Main Out 2": H25.14 H26.7 | length 4.2
  Top Layer w0.4: H26.7 H25.14
"Main Out 2_X": H19.6 H20.5 H20.6 H25.13 | length 42.8
  Top Layer w0.4: H19.6 H20.5 H20.6 49.306,14 50.546,15.24 70.739,15.24 73.76,12.219 H25.13
"Main Out 3": H25.12 H26.6 | length 4.2
  Top Layer w0.4: H26.6 H25.12
"Main Out 3_X": H19.4 H20.3 H20.4 H25.11 | length 45.9
  Top Layer w0.3: H19.4 H20.3 H20.4 72.741,16.54 76.343,12.938 76.343,9.313 H25.11
"Main Out 4": H25.10 H26.5 | length 4.2
  Top Layer w0.4: H26.5 H25.10
"Main Out 4_X": H18.3 H18.4 H19.3 H25.9 | length 90.2
  Top Layer w0.3: H19.3 H18.4 H18.3 20.163,16.54 18.796,17.907 18.796,21.463 20.066,22.733 74.93,22.733 78.84,18.823 H25.9
"Main Out 5": H25.8 H26.4 | length 4.2
  Top Layer w0.4: H26.4 H25.8
"Main Out 5_X": H18.5 H18.6 H19.5 H25.7 | length 97.6
  Top Layer w0.3: H19.5 H18.6 H18.5 20.29,14 17.78,16.51 17.78,21.844 19.812,23.876 75.946,23.876 81.38,18.442 H25.7
"Main Out 6": H25.6 H26.3 | length 4.2
  Top Layer w0.4: H26.3 H25.6@83.92,6.73
"Main Out 6_X": H18.7 H18.8 H19.7 H25.5 | length 105
  Top Layer w0.3: H19.7 H18.8 H18.7 20.798,11.46 16.891,15.367 16.891,22.733 18.923,24.765 77.724,24.765 83.92,18.569 H25.5
"Main Out 7": H25.4 H26.2 | length 4.2
  Top Layer w0.4: H26.2 H25.4
"Main Out 8": H25.2 H26.1 | length 4.2
  Top Layer w0.4: H26.1 H25.2
NetC6_1: C12.1 U1.3 | length 27.5
  Top Layer w0.3: v1(12,59) C12.1
  Layer 2 w0.3: v1@11.938,59 11.938,55.753 12.192,55.499 27.929,55.499 v1(29.73,57.3)
  Bottom Layer w0.3: U1.3 v1(29.73,57.3)
NetC6_2: C12.2 D1.1 L2.1 U1.1 U1.6 | length 42.1
  Top Layer w0.3: C12.2 v1(12,66.25)
  Layer 2 w0.3: v1(12,66.25) 22.75,66.25 v1(28.25,60.75) 28.785,60.75 32.235,57.3 v1(33.54,57.3)
  Layer 2 w0.4: v1(33.54,57.3) v1(33.54,64.25)
  Bottom Layer w0.3: L2.1 27.169,60.75 v1(28.25,60.75)
  Bottom Layer w0.4: D1.1 D1.1@33.54,67.125 ; v1@33.534,57.398 33.534,55.756 U1.6 ; v1(33.54,64.25) D1.1@33.54,67.125 ; D1.1@34.336,66.329 D1.1@33.54,67.125
  Bottom Layer w1: L2.1@27.23,58.981 L2.1@27.23,60.706
NetC32_1: C11.1 U2.3 | length 13.6
  Top Layer w0.3: C11.1@10.16,63.171 10.16,57.912 10.772,57.3 v1(16.73,57.3)
  Bottom Layer w0.3: U2.3 v1(16.73,57.3)
NetC32_2: C11.2 D2.1 L1.1 U2.1 U2.6 | length 32.7
  Top Layer w0.3: C11.2 v1(10,66.25)
  Bottom Layer w0.3: v1@10.033,66.322 10.033,62.904 12.021,60.916 12.065,60.96 13.915,60.96 L1.1 14.289,60.914 14.289,63.289 15.262,64.262 18.392,64.262 20.525,66.395 D2.1
  Bottom Layer w0.4: D2.1 21.336,66.329 21.336,57.912 20.54,57.116 U2.6
"Radio CTS": Radio1.3 X8.4 | length 90
  Top Layer w0.3: v1(80.391,77.597) 81.757,77.597 Radio1.3 Radio1.3@86.35,81.958
  Bottom Layer w0.3: X8.4 66.76,16.51 78.867,16.51 84.201,21.844 84.201,73.787 v1(80.391,77.597)
"Radio RTS": Radio1.11 X8.5 | length 83.8
  Bottom Layer w0.3: X8.5 66.016,19.794 66.016,18.947 67.437,17.526 78.486,17.526 83.312,22.352 83.312,73.152 76.19,80.274 Radio1.11
"Radio RX": Radio1.7 X8.2 | length 95.8
  Bottom Layer w0.3: X8.2 63.712,14.478 79.502,14.478 85.852,20.828 85.852,77.608 Radio1.7
"Radio TX": Radio1.9 X8.3 | length 92
  Bottom Layer w0.3: X8.3 65.236,15.494 79.248,15.494 84.963,21.209 84.963,75.957 Radio1.9
SCL: H2.3 H3.3 H4.3 H5.3 H6.3 H7.3 H8.2 H9.2 H10.2 H11.2 H12.2 H13.2 H14.2 H15.2 H16.2 H17.2 X1.5 | length 291.7
  Bottom Layer w0.3: H13.2 22.02,31.545 22.643,32.168 36.02,32.168 ; H9.2 33.48,34.332 ; H14.2 36.02,32.168 ; X1.5 52.705,89.095 52.705,79.756 46.99,74.041 46.99,59.182 45.28,57.472 H2.3 45.28,51.453 45.858,50.875 59.574,50.875 60.14,51.441 H3.3 60.14,51.453 60.718,50.875 73.735,50.875 74.709,51.849 74.709,51.925 75,52.216 H4.3 77,50.5 H7.3 75.375,47.625 62.706,47.625 62.14,47.059 H6.3 62.14,47.047 61.562,47.625 48.905,47.625 H5.3 47.28,45.756 40.767,39.243 22.473,39.243 H8.2 19.48,35.13 20.278,34.332 33.48,34.332 ; H10.2@47.38,36.35 H10.2 47.48,34.332 ; H15.2 50.02,32.168 ; H11.2 61.48,34.332 ; H16.2 64.02,32.168 76.102,32.168 H17.2 78.02,33.71 H12.2 73.562,34.332 61.48,34.332 ; 64.02,32.027 63.879,32.168 50.02,32.168 ; 33.48,34.332 47.48,34.332 ; 36.02,32.168 50.02,32.168 ; 47.48,34.332 61.48,34.332
SDA: H2.4 H3.4 H4.4 H5.4 H6.4 H7.4 H8.3 H9.3 H10.3 H11.3 H12.3 H13.3 H14.3 H15.3 H16.3 H17.3 X1.3 | length 293.7
  Top Layer w0.3: H14.3 33.48,32.168 ; H9.3 36.02,34.332 ; H2.4 47.28,51.453 ; H15.3 47.48,32.168 ; H10.3 50.02,34.332 ; H16.3 61.48,32.168 ; H11.3 64.02,34.332 ; H17.3 75.48,31.581 74.893,32.168 61.48,32.168 ; H4.4 77,51.441 76.434,50.875 62.718,50.875 62.14,51.453 H3.4 62.14,51.441 61.574,50.875 47.858,50.875 47.28,51.453 ; 33.48,32.168 21.398,32.168 H13.3 19.48,33.71 H8.3 22.02,35.864 22.381,35.504 22.381,35.404 23.453,34.332 36.02,34.332 ; 33.48,32.168 47.48,32.168 ; 36.02,34.332 50.02,34.332 ; 47.28,51.453 45.28,49.453 H5.4 46.905,47.625 59.562,47.625 60.14,47.047 H6.4 60.14,47.059 60.706,47.625 73.375,47.625 H7.4 75,42.221 78.02,39.201 H12.3 78.02,34.919 77.433,34.332 64.02,34.332 ; 47.48,32.168 61.48,32.168 ; 50.02,34.332 64.02,34.332
  Bottom Layer w0.3: X1.3 49.018,95.62 49.349,95.288 49.365,95.288 54.229,90.424 54.229,78.74 50.419,74.93 50.419,58.42 51.054,57.785 75.184,57.785 77,55.969 H4.4
pads on no net: D1.3 D2.3 H2.6 H3.6 H4.6 H5.6 H6.6 H7.6 H25.1 H25.3 H25.17 H25.19 Radio1.5 Radio1.6 Radio1.8 Radio1.10 Radio1.12 Radio1.13 Radio1.14 Radio1.15 Radio1.X U1.5 U2.5 X1.1 X1.2 X1.4 X1.7 X1.11 X1.12 X1.13 X1.15 X1.16 X1.17 X1.18 X1.19 X1.20 X1.21 X1.22 X1.23 X1.24 X1.26 X1.27 X1.28 X1.29 X1.31 X1.32 X1.33 X1.35 X1.36 X1.37 X1.38 X1.40 X2.2 X2.3 X8.1

## Polygon pours and split planes (outlines as drawn)
GND on Top Layer "Top Layer GND" (hatched 45Degree grid 0.508 track 0.203, remove dead copper, pour order 32): 0,99 99,99 99,0 0,0
"Battery VIN" on Top Layer "Battery VIN to Regulators" (solid, remove dead copper, pour order 26): 96.5,56 96.5,36 85,36 85,42 83.5,42 83.5,58.75 57.5,58.75 57.5,65.75 27,65.75 27,56 35.5,56 35.5,52 14.75,52 14.75,56 22,56 22,69 57.5,69 57.5,76 88,76 88,56
+3V3 on Top Layer "+3V3 to Caps" (solid, remove dead copper, pour order 28): 55,72 55,76 16.25,76 16.25,58 20.5,58 20.5,72
+5V on Top Layer "+5V Output to Caps" (solid, remove dead copper, pour order 25): 31.75,63.5 55,63.5 55,58 31.75,58
"Battery VIN" on Top Solder "Batt VIN" (solid, remove dead copper, pour order 2): 96.5,56 96.5,36 88,36 88,56
GND on Bottom Layer "Bottom Layer GND" (hatched 45Degree grid 0.508 track 0.203, remove dead copper, pour order 33): 0,99 99,99 99,0 0,0
+5V on Bottom Layer "+5V Output" (solid, remove dead copper, pour order 27): 33.25,63.5 33.25,58 29.25,58 29.25,63.456
NetC32_2 on Bottom Layer "+3V3 Raw Output" (solid, remove dead copper, pour order 21): 14.75,54.75 14.75,63.75 11.5,63.75 11.5,54.75
+3V3 on Bottom Layer "+3V3 Output" (solid, pour order 24): 16.25,63.5 20.5,63.5 20.5,58 16.25,58
NetC6_2 on Bottom Layer "5V Raw Output" (solid, remove dead copper, pour order 22): 27.75,54.75 27.75,63.75 24.5,63.75 24.5,54.75
"Battery VIN" on Bottom Layer "Batt VIN" (solid, remove dead copper, pour order 3): 96.5,56 96.5,36 88,36 88,56
"Battery VIN" on Bottom Solder "Batt VIN" (solid, remove dead copper, pour order 4): 96.5,56 96.5,36 88,36 88,56
GND on Layer 1 "Main GND Poly" (solid, remove dead copper, pour order 19): 0,0 0,99 99,99 99,0
"Battery VIN" on Layer 1 "Batt VIN" (solid, remove dead copper, pour order 0): 96.5,56 96.5,36 88,36 88,56
+3V3 on Layer 2 "+3V3 to ToF Sensors" (solid, remove dead copper, pour order 31): 82,55.08 39.13,55.08 39.13,43.42 82,43.42
+5V on Layer 2 "+5V to Peripheral Connectors" (solid, remove dead copper, pour order 30): 83.5,40.5 83.5,26 14,26 14,40.5
+3V3 on Layer 2 "+3V3 to Motor Drivers" (solid, remove dead copper, pour order 29): 50.4,24.5 1.5,24.5 1.5,2.024 1.524,2 16,2 16,17.85 50.4,17.85
+5V on Layer 2 "RXDx900 +5V Poly" (solid, remove dead copper, pour order 13): 69.5,90.75 69.5,81.25 90.5,81.25 90.5,90.75
+3V3 on Layer 2 "CubePilot 3V3 Poly" (solid, remove dead copper, pour order 14): 91.65,18.278 91.65,10.678 97.65,10.678 97.65,18.278
"Battery VIN" on Layer 2 "Batt VIN" (solid, remove dead copper, pour order 6): 96.5,56 96.5,36 88,36 88,56

## Keep-outs
Keep-Out Layer:
  the board outline again, w0.254

## Other copper
Layer 1:
  pour cut-out: 96.5,36 88,36 88,56 96.5,56

## Silkscreen, mask and mechanical layers (free items; w line width, h text height)
Top Overlay:
  drawing of 37 lines, arcs and shapes, not listed
  text "UART" at 47.602,77.4 h1.5
  text "Interface / Board" at 12.754,75 h3
  text "Pi PWR" at 10.783,70.25 h1.5 r90
  text "-" at 98.25,60.5 h1.5 r90
  text "V0" at 24.334,59.5 h2
  text "+5V" at 9.5,54.08 h1
  text "MOTORS" at 87.1,51.751 h1.5 r90
  text "+" at 98.25,50.5 h1.5 r90
  text "+3V3" at 9.5,49 h1
  text "ToF" at 37.35,47.251 h1.5 r90
  text "GND" at 9.5,44 h1
  text "I2C Connections" at 14.65,42.15 h1.5
  text "+" at 98.25,40.5 h1.5 r90
  text "GND" at 9.5,38.92 h1
  text "BATTERY" at 87.1,31.002 h1.5 r90
  text "-" at 98.25,30.5 h1.5 r90
  text "Servos" at 2.4,25.65 h1.5
  text "Cube Pilot" at 82.406,22.371 h1.5
  text "TELEM1" at 71.3,21.95 h1.5
  text "+3V3" at 91.801,19.2 h1.5
  text "AUX 1" at 56.48,11.25 h1 r90
  text "AUX 2" at 59.02,11.25 h1 r90
  text "AUX 3" at 61.56,11.25 h1 r90
  text "AUX 4" at 64.1,11.25 h1 r90
  text "AUX 5" at 66.64,11.25 h1 r90
  text "AUX 6" at 69.18,11.25 h1 r90
  text "MAIN 1" at 71.72,11.25 h1 r90
  text "MAIN 2" at 74.26,11.25 h1 r90
  text "MAIN 3" at 76.8,11.25 h1 r90
  text "MAIN 4" at 79.34,11.25 h1 r90
  text "MAIN 5" at 81.88,11.25 h1 r90
  text "MAIN 6" at 84.42,11.25 h1 r90
  text "MAIN 7" at 86.96,11.25 h1 r90
  text "MAIN 8" at 89.5,11.25 h1 r90
  text "Motor Drivers" at 25.253,1.15 h1.5
Bottom Overlay:
  lines w0.254: 23.082,8.92 23.718,8.92 ; 23.082,14 23.718,14 ; 23.082,19.08 23.718,19.08 ; 34.082,8.92 34.718,8.92 ; 34.082,19.08 34.718,19.08 ; 45.082,8.92 45.718,8.92 ; 45.082,19.08 45.718,19.08
  text "GND" at 71.61,94.226 h1 r90
  text "+5V" at 86.85,94.226 h1 r90
  text "GND" at 89.39,94.226 h1 r90
  text "SCL" at 46.68,93.87 h1 r90
  text "SDA" at 49.22,93.87 h1 r90
  text "TX" at 41.6,86.25 h1 r90
  text "RX" at 44.14,86.25 h1 r90
  text "TX" at 57.41,81.25 h1 r90
  text "RX" at 59.95,81.25 h1 r90
  text "GND" at 62.49,81.25 h1 r90
  text "RTS" at 76.69,80.44 h1 r90
  text "TX" at 79.23,80.44 h1 r90
  text "RX" at 81.77,80.44 h1 r90
  text "CTS" at 86.85,80.44 h1 r90
  text "GND" at 89.39,80.44 h1 r90
  text "GND" at 87.56,62.333 h1 r90
  text "SCL" at 45.78,56.916 h1 r90
  text "SDA" at 47.78,56.916 h1 r90
  text "SCL" at 60.64,56.916 h1 r90
  text "SDA" at 62.64,56.916 h1 r90
  text "SCL" at 75.5,56.916 h1 r90
  text "SDA" at 77.5,56.916 h1 r90
  text "+5V" at 8.916,54.08 h1
  text "VIN" at 87.56,52.25 h1 r90
  text "+3V3" at 9.915,49 h1
  text "SDA" at 45.78,44.25 h1 r90
  text "SCL" at 47.78,44.25 h1 r90
  text "SDA" at 60.64,44.25 h1 r90
  text "SCL" at 62.64,44.25 h1 r90
  text "SDA" at 75.5,44.25 h1 r90
  text "SCL" at 77.5,44.25 h1 r90
  text "GND" at 8.916,44 h1
  text "VIN" at 87.56,42.25 h1 r90
  text "SCL" at 19.98,40.666 h1 r90
  text "SDA" at 22.52,40.666 h1 r90
  text "GND" at 25.06,40.666 h1 r90
  text "SCL" at 33.98,40.666 h1 r90
  text "SDA" at 36.52,40.666 h1 r90
  text "GND" at 39.06,40.666 h1 r90
  text "SCL" at 47.98,40.666 h1 r90
  text "SDA" at 50.52,40.666 h1 r90
  text "GND" at 53.06,40.666 h1 r90
  text "SCL" at 61.98,40.666 h1 r90
  text "SDA" at 64.52,40.666 h1 r90
  text "GND" at 67.06,40.666 h1 r90
  text "SCL" at 75.98,40.666 h1 r90
  text "SDA" at 78.52,40.666 h1 r90
  text "GND" at 81.06,40.666 h1 r90
  text "GND" at 8.916,38.92 h1
  text "GND" at 87.56,32.333 h1 r90
  text "GND" at 17.44,28.5 h1 r90
  text "SDA" at 19.98,28.5 h1 r90
  text "SCL" at 22.52,28.5 h1 r90
  text "GND" at 31.44,28.5 h1 r90
  text "SDA" at 33.98,28.5 h1 r90
  text "SCL" at 36.52,28.5 h1 r90
  text "GND" at 45.44,28.5 h1 r90
  text "SDA" at 47.98,28.5 h1 r90
  text "SCL" at 50.52,28.5 h1 r90
  text "GND" at 59.44,28.5 h1 r90
  text "SDA" at 61.98,28.5 h1 r90
  text "SCL" at 64.52,28.5 h1 r90
  text "GND" at 73.44,28.5 h1 r90
  text "SDA" at 75.98,28.5 h1 r90
  text "SCL" at 78.52,28.5 h1 r90
  text "A4" at 4.454,20.191 h1
  text "GND" at 15.88,20.191 h1
  text "+3V3" at 29.715,18.58 h1
  text "+3V3" at 40.715,18.58 h1
  text "+3V3" at 51.715,18.58 h1
  text "NC" at 56.15,18.25 h1 r90
  text "RX" at 58.69,18.25 h1 r90
  text "TX" at 61.23,18.25 h1 r90
  text "RTS" at 66.31,18.25 h1 r90
  text "GND" at 68.85,18.25 h1 r90
  text "CTS" at 63.77,18.25 h1 r90
  text "+3V3" at 4.454,17.651 h1
  text "+3V3" at 16.879,17.651 h1
  text "M4" at 20.75,16.04 h1
  text "M4" at 27.716,16.04 h1
  text "M4" at 31.75,16.04 h1
  text "M3" at 38.716,16.04 h1
  text "M3" at 42.75,16.04 h1
  text "M3" at 49.716,16.04 h1
  text "GND" at 93.75,15.248 h1
  text "GND" at 4.454,15.111 h1
  text "A1" at 14.547,15.111 h1
  text "M5" at 20.75,13.5 h1
  text "M5" at 27.716,13.5 h1
  text "M5" at 31.75,13.5 h1
  text "M2" at 38.716,13.5 h1
  text "M2" at 42.75,13.5 h1
  text "M2" at 49.716,13.5 h1
  text "+3V3" at 93.75,12.708 h1
  text "A2" at 59.02,12.686 h1 r90
  text "A3" at 61.56,12.686 h1 r90
  text "A4" at 64.1,12.686 h1 r90
  text "M2" at 74.26,12.686 h1 r90
  text "M3" at 76.8,12.686 h1 r90
  text "M4" at 79.34,12.686 h1 r90
  text "M5" at 81.88,12.686 h1 r90
  text "M6" at 84.42,12.686 h1 r90
  text "A1" at 56.48,12.353 h1 r90
  text "M1" at 71.72,12.353 h1 r90
  text "M6" at 20.75,10.96 h1
  text "M6" at 27.716,10.96 h1
  text "M6" at 31.75,10.96 h1
  text "M1" at 38.383,10.96 h1
  text "M1" at 42.75,10.96 h1
  text "M1" at 49.383,10.96 h1
  text "A3" at 4.454,9.191 h1
  text "GND" at 15.88,9.191 h1
  text "GND" at 28.716,8.42 h1
  text "GND" at 39.716,8.42 h1
  text "GND" at 50.716,8.42 h1
  text "+3V3" at 4.454,6.651 h1
  text "+3V3" at 16.879,6.651 h1
  text "GND" at 4.454,4.111 h1
  text "A2" at 14.88,4.111 h1
Top Solder:
  region: 96.5,56 96.5,36 88,36 88,56
Bottom Solder:
  region: 96.5,56 96.5,36 88,36 88,56
Planning:
  lines w0.1: 31.75,58 31.75,63.5 ; 33.25,58 33.25,63.5 ; 88.011,56.011 88,56 ; 88,56 88,76 57.5,76 57.5,69 22,69 22,56 14.75,56 14.75,52 35.5,52 35.5,56 27,56 27,65.75 57.5,65.75 57.5,58.75 83.5,58.75 83.5,42 85,42 85,36 96.5,36 96.5,56 88,56 ; 1.5,2 1.5,24.5 50.4,24.5 50.4,17.85 16,17.85 16,2 1.5,2 ; 14,26 83.5,26 83.5,40.5 14,40.5 14,26 ; 16.25,58 20.5,58 20.5,72 55,72 55,76 16.25,76 16.25,58 ; 29.25,58 29.25,63.5 55,63.5 55,58 29.25,58 ; 39,41 39,41 ; 39.13,43.42 39.13,55.08 82,55.08 82,43.42 39.13,43.42 ; 69.5,81.25 90.5,81.25 90.5,90.75 69.5,90.75 69.5,81.25

## Text inside footprints (layer, text, board x,y; h text height)
C1: Top Overlay "+" at 45.128,73.933 h1.3 r270
C2: Top Overlay "+" at 53.878,73.933 h1.3 r270
C3: Top Overlay "+" at 62.628,73.933 h1.3 r270
C4: Top Overlay "+" at 71.378,73.933 h1.3 r270
C5: Top Overlay "+" at 80.128,73.933 h1.3 r270
C6: Top Overlay "+" at 42.872,60.817 h1.3 r90
C7: Top Overlay "+" at 51.622,60.817 h1.3 r90
C8: Top Overlay "+" at 60.372,60.817 h1.3 r90
C9: Top Overlay "+" at 69.122,60.817 h1.3 r90
C10: Top Overlay "+" at 77.872,60.817 h1.3 r90
Radio1: Top Overlay "1" at 88.723,87.75 h1
X4: Top Overlay "[Front]" at 1.458,56.462 h0.75 r270; Top Overlay "4-Pin Screw Term" at 7.681,56.462 h0.75 r270